# Altium PCB TYPEC_4KTransmitter-v1.0.PcbDoc (part 12 of 12)
Units mil, origin at the board's own origin, x right, y up, seen from the top; angles counter-clockwise.
Board outline 2834.7 x 1259.84 mil, 10 copper layers (Top Layer, GND-1, Signal L1, GND-2, PWR-1, PWR-2, GND-3, Signal L2, GND-4, Bottom Layer), stack 61.686 mil thick; 475 components, 338 nets, 2161 pads, 1240 vias.
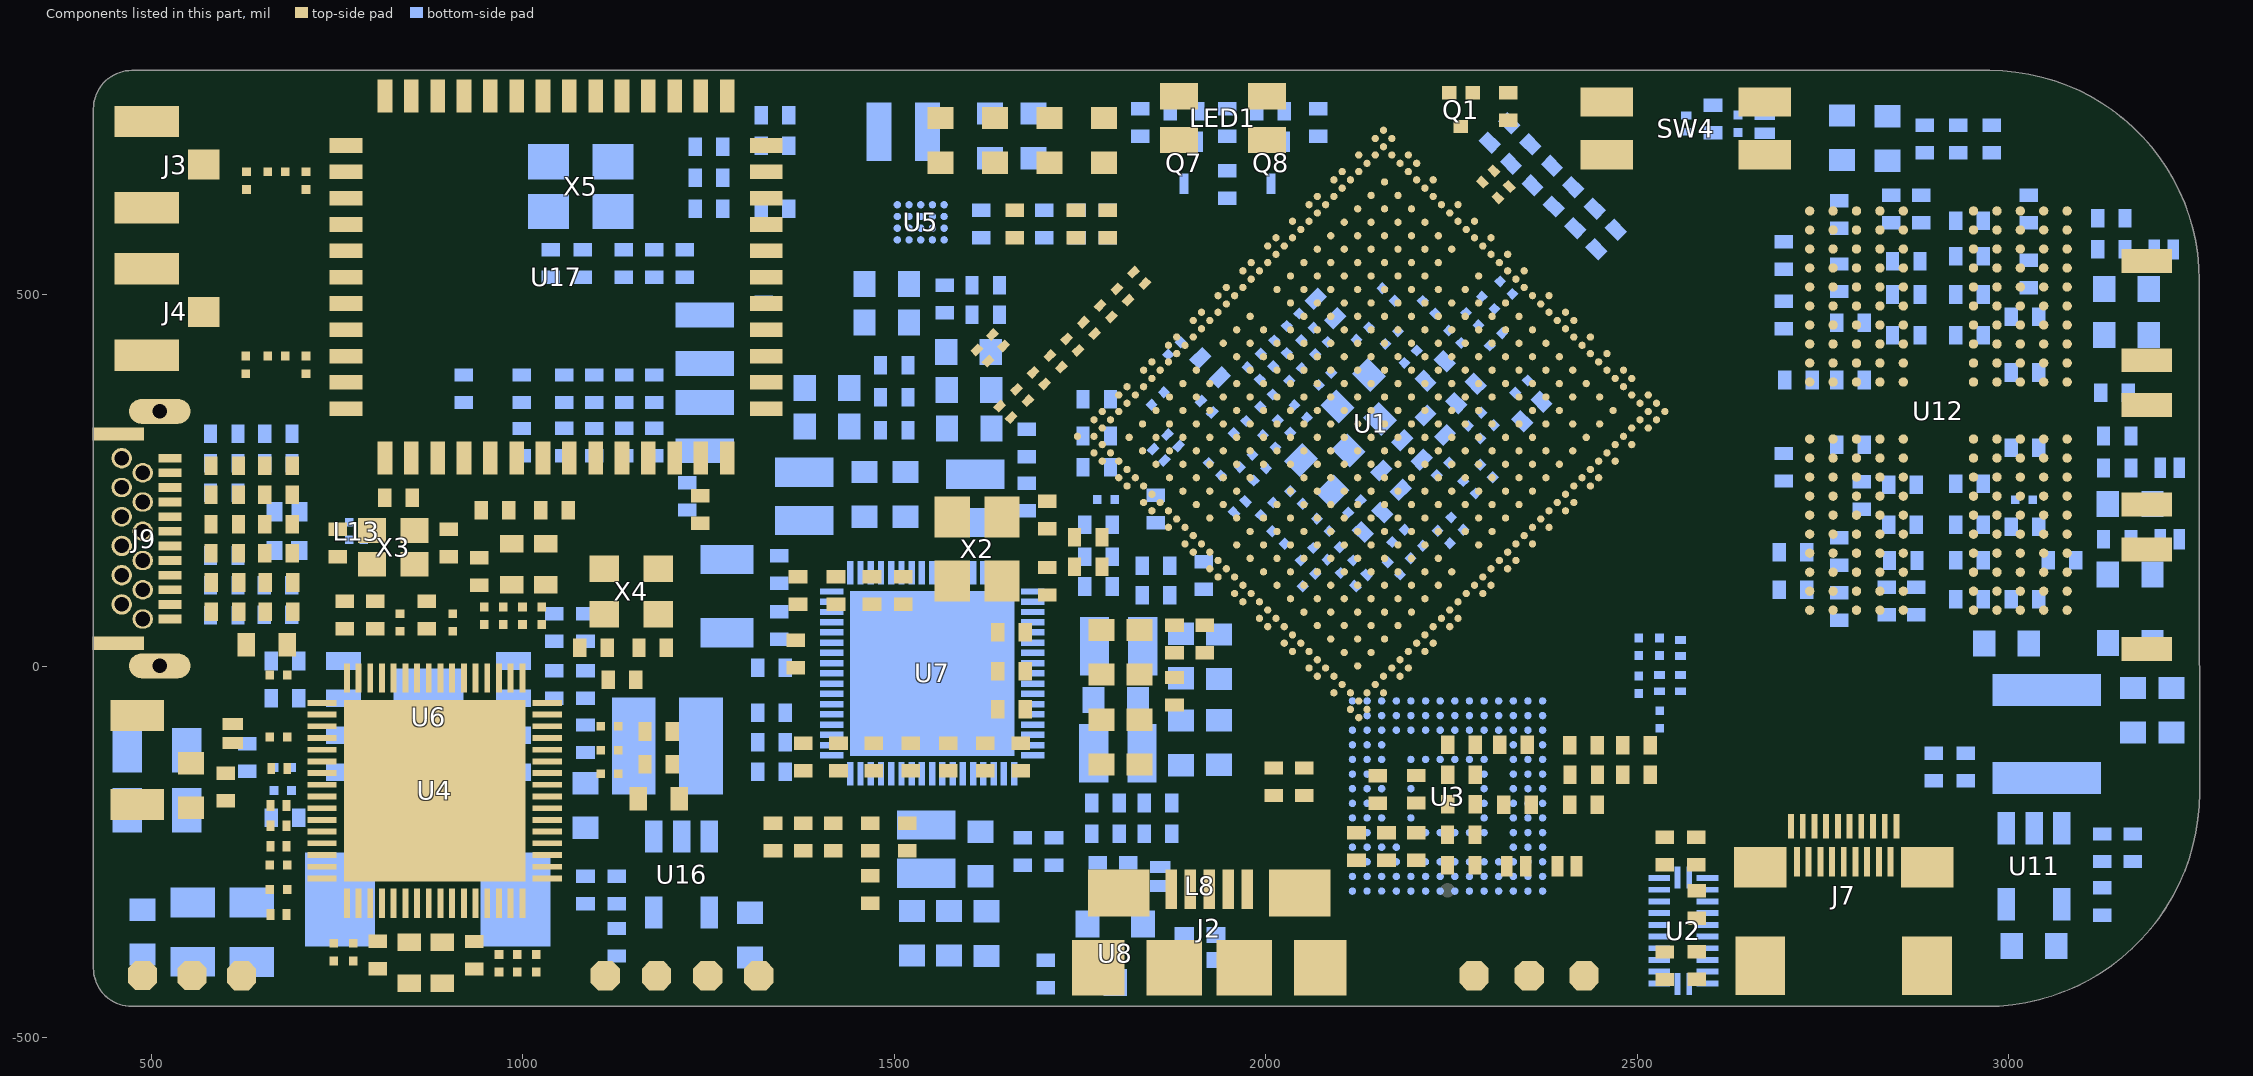
[diagram p18: the components of this part, seen from the top]

## Other copper (continued)
Bottom Layer:
  rectangle net VCC3V3_SYS: 1595.18,-247.78 1606.39,-187.05
  rectangle net VCC5V0_SYS: 2515.11,-289.34 2544.64,-256.98
  rectangle net VCC3V3_SYS: 1598.68,-247.78 1633.68,-208.17
  rectangle net VCC3V3_SYS: 1721.13,53.48 1725.06,68.58
  rectangle net NetC5_2: 1205.99,237.9 1316.22,306.49
  rectangle net VCCA1V8_IMAGE: 1742.65,90.73 1777.78,119.53
  rectangle net NetC10_2: 919.64,-377.27 1037.66,-251.28
  rectangle net VCC_1V2: 836.09,-440.56 856.21,-403.86
  rectangle net VCC3V3_SYS: 1340.01,-75.27 1367.49,-22.94
  rectangle net VCC3V3_SYS: 1491.82,-164.75 1500.48,-145.21
  rectangle net VCC3V3_SYS: 1277.47,-363.29 1374.87,-285.65
  rectangle net VCC_1V8: 1346.89,594.19 1397.36,651.51
  rectangle net VCC_3V3: 2566.29,-447.85 2580.07,-436.02
  rectangle net GND: 1031.94,77.44 1052.79,84.53
  region net GND: 626.13,-4.76 626.13,16.08 619.04,16.08 619.04,-4.76
  rectangle net GND: 448.03,-238.82 508.17,-81.46
  region net GND: 1062.89,-89.88 1062.89,-69.03 1055.8,-69.03 1055.8,-89.88
  rectangle net GND: 1038.79,-72.29 1059.63,-65.2
  rectangle net GND: 1202.08,-280.59 1225.7,-207.76
  rectangle net GND: 1181.38,-298.94 1259.01,-257.77
  rectangle net USB_D_N: 655.12,139.44 676.77,168.52
  rectangle net GND: 688.58,139.44 710.24,168.52
  rectangle net VCCIO_WL: 1260.37,594.19 1330.12,669.73
  rectangle net VCC0V6_DDR: 2874.86,709.36 2944.86,736.86
  rectangle net VCC5V_USB: 1818.91,-343.44 1885.98,-287.21
  rectangle net GND: 1877.54,-406.45 1905.44,-384.8
  rectangle net GND: 1917.25,-406.45 1946.14,-384.8
  rectangle net USB2.0_D_P: 1917.25,-372.99 1946.14,-351.34
  rectangle net USB2.0_D_N: 1877.54,-372.99 1905.44,-351.34
  rectangle net HDMITX_CEC: 2550.54,-447.85 2558.42,-413.36
  rectangle net VCC5V_USB: 1761.68,-310.92 1885.98,-287.21
  rectangle net VCC5V_USB: 1818.91,-365.34 1872.28,-288.17
  rectangle net SDMMC1_D3: 1027.62,340.11 1068.31,363.73
  rectangle net NetC5_2: 1209.22,237.9 1234.22,292.56
  rectangle net GND: 448.03,-418.27 669.31,-358.23
  rectangle net GND: 3124.22,-104.53 3247.36,-74.53
  rectangle net GND: 2965.52,-394.08 3019.35,-359.08
  rectangle net GND: 1311.89,478.15 1356.27,498.56
  region net GND: 1574.58,125.27 1574.58,72.71 1583.16,72.71 1583.16,125.27
  region net GND: 1588.36,125.27 1588.36,72.71 1596.94,72.71 1596.94,125.27
  region net GND: 1491.9,125.27 1491.9,72.71 1500.48,72.71 1500.48,125.27
  rectangle net GND: 1416.03,40.9 1468.59,49.48
  rectangle net GND: 868.22,-105.09 1037.66,-81.46
  rectangle net NetC5_2: 1205.99,273.03 1291.03,306.49
  rectangle net NetL10_1: 3059.94,-240.04 3101.75,-152.53
  rectangle net VCC3V3_SYS: 3037.22,-405.82 3107.71,-348.82
  rectangle net VCC3V3_SYS: 3037.22,-401.41 3083.57,-299.1
  rectangle net VCC3V3_SYS: 1442.68,186.07 1477.68,216.07
  rectangle net VCC3V3_SYS: 1425.67,186.07 1477.68,226.42
  rectangle net VCC3V3_SYS: 1228.89,-363.29 1374.87,-310.12
  rectangle net VCC_DDR: 3118.82,12.53 3171.41,98.85
  rectangle net VCC_DDR: 3071.77,12.53 3171.41,47.53
  rectangle net VCC_DDR: 2952.36,12.53 2992.36,47.53
  rectangle net VCC_DDR: 1501.68,-345.27 1586.45,-259.27
  rectangle net VCC_DDR: 1501.68,-350.91 1641.86,-309.97
  rectangle net VCCA1V8_IMAGE: 1742.65,94.53 1777.78,119.53
  rectangle net VCCA1V8_IMAGE: 1767.46,82.91 1777.78,99.18
  rectangle net VDD_GPU: 1825.18,78.88 1843.18,107.53
  rectangle net VDD_GPU: 1827.36,95.03 1841.01,135.03
  rectangle net NetC10_2: 943.17,-377.27 1037.66,-121.57
  rectangle net NetC11_1: 1030.1,-15.25 1097.1,2.74
  rectangle net NetC36_2: 1509.68,304.71 1527.68,417.53
  rectangle net NetC167_2: 1205.99,440.82 1336.89,464.44
  rectangle net NetC167_2: 1299.67,443.56 1324.39,461.56
  rectangle net NetC254_1: 3113.69,-307.25 3179.85,-254.07
  rectangle net NetC292_1: 1072.1,-363.29 1188.3,-310.12
  rectangle net NetL9_2: 1205.99,405.32 1313.82,428.94
  rectangle net NetL11_1: 1235.48,-251.06 1277.47,-42.44
  rectangle net NetR4_1: 987.86,-52.25 1055.1,-34.25
  rectangle net NetR11_2: 691.74,-5.09 777.47,18.54
  rectangle net NetR38_1: 692.29,-55.09 777.47,-31.46
  region net VCC5V_USB: 1761.68,-292.92 1761.68,-310.92 1872.28,-310.92 1872.28,-292.92
  rectangle net VCC_1V2: 1117.55,-291.77 1147.6,-168.94
  rectangle net VCC_1V2: 1048.85,-291.77 1139.39,-273.77
  rectangle net VCC_1V2: 1067.1,-176.6 1179.14,-105.09
  rectangle net VCC_WL: 1260.37,686.31 1341.51,779.61
  region net VCC3V3_SYS: 1497.8,151.98 1505.6,144.17 1505.6,109.52 1514.26,109.52 1514.26,153.89 1506.98,161.17
  region net VCC3V3_SYS: 1657.58,221.46 1657.58,171.83 1668.52,179.34 1679.86,190.68 1683.83,190.68 1694.55,201.4 1694.55,221.46
  region net NetR10_1: 1657.18,125.27 1657.18,141.03 1664.96,148.81 1668.03,145.74 1668.03,144.83 1665.44,142.24 1665.84,141.85 1665.84,125.27
  region net NetC33_2: 1643.4,125.27 1643.4,141.03 1651.18,148.81 1654.25,145.74 1654.25,144.83 1651.67,142.24 1652.06,141.85 1652.06,125.27
  pour cut-out: 934.03,-229.95 906.39,-229.95 906.39,-238.62 1037.66,-238.62 1037.66,-115.52 934.03,-115.52
  pour cut-out: 786.56,25.52 675.82,25.52 675.82,-31.46 782.47,-31.46 782.47,-229.95 792.55,-229.95 792.55,25.52
  pour cut-out: 1496.19,-356.32 1598.68,-356.32 1598.68,-233.68 1496.19,-233.68
  pour cut-out: 2465.41,-218.14 2632.14,-218.14 2632.14,-19.46 2465.41,-19.46
  pour cut-out: 1684.31,534.77 1804.51,534.77 1804.51,590.55 1684.31,590.55
  pour cut-out: 982.46,243.2 1289.73,243.2 1289.73,421.49 982.46,421.49
  pour cut-out: 565.94,51.9 688.58,51.9 688.58,232.03 565.94,232.03
  pour cut-out: 567.33,230.61 702.18,230.61 702.18,328.79 567.33,328.79
  pour cut-out: 819.36,-458.69 919.64,-458.69 919.64,-360.52 819.36,-360.52
  pour cut-out: 2313.83,142.9 2314.64,142.09 2314.64,135.13 2469.74,-19.97 3142.35,-19.97 3142.35,633.66 3073.08,702.94 2452.65,702.94 2313.83,564.12
  pour cut-out: 2162.35,-282.47 2421.92,-282.47 2421.92,-50.73 2162.98,-50.73 2162.35,-51.36

## Silkscreen, mask and mechanical layers (free items; w line width, h text height)
Top Overlay:
  drawing of 53 lines, arcs and shapes, not listed
  text "RCY" at 3138.39,551.55 h30 r90
  text "PWR" at 3138.39,355.8 h30 r90
  text "S" at 560.29,308.65 h50
  text "S" at 586.9,308.47 h50
  text "RST" at 3143.37,159.82 h30 r90
  text "4K" at 2672.67,-143.72 h50
  text "2.0" at 1964.17,-253.64 h50
  text "D0" at 2169.78,-361.94 h40
  text "GND" at 2290.66,-377.7 h40 r90
  text "RX" at 2365.59,-377.7 h40 r90
  text "5V0" at 498.53,-378.79 h40 r90
  text "3V3" at 565.18,-378.79 h40 r90
  text "GND" at 631.84,-378.79 h40 r90
  text "TX" at 2447.5,-382.7 h40 r90
  text "GPIO" at 1129.57,-383.79 h40 r90
  text "HPD" at 1196.73,-383.79 h40 r90
  text "SDA" at 1266.92,-383.79 h40 r90
  text "SCL" at 1335.8,-383.79 h40 r90
Bottom Overlay:
  lines w10: 682.78,547.75 686.16,551.14
  lines w12: 659.82,559.56 659.82,550.49 663.21,547.1 ; 664.66,545.76 680.78,545.76 686.16,551.14 686.16,560.21
  text "RE  EIVER" at 655.16,483.96 h60 r270
  text "4K" at 655.29,399.53 h60 r270
Dimensions:
  drawing of 659 lines, arcs and shapes, not listed
  text "Layer" at 567.85,5981.73 h60
  text "Name" at 977.76,5981.73 h60
  text "Material" at 1907.5,5981.73 h60
  text "Thickness" at 2507.36,5981.73 h60
  text "Constant" at 3157.19,5981.73 h60
  text "Board Layer Stack" at 3727.05,5981.73 h60
  text "Top Overlay" at 977.76,5861.73 h60
  text "Top Solder" at 977.76,5741.73 h60
  text "SM-001" at 1907.5,5741.73 h60
  text "0.025mm" at 2507.36,5741.73 h60
  text "4" at 3157.19,5741.73 h60
  text "1" at 567.85,5621.73 h60
  text "Top Layer" at 977.76,5621.73 h60
  text "0.035mm" at 2507.36,5621.73 h60
  text "Dielectric 1" at 977.76,5501.73 h60
  text "PP-007" at 1907.5,5501.73 h60
  text "0.076mm" at 2507.36,5501.73 h60
  text "4.2" at 3157.19,5501.73 h60
  text "2" at 567.85,5381.73 h60
  text "GND-1" at 977.76,5381.73 h60
  text "CF-004" at 1907.5,5381.73 h60
  text "0.035mm" at 2507.36,5381.73 h60
  text "Dielectric 2" at 977.76,5261.73 h60
  text "PP-007" at 1907.5,5261.73 h60
  text "0.076mm" at 2507.36,5261.73 h60
  text "4.2" at 3157.19,5261.73 h60
  text "Dielectric 3" at 977.76,5141.73 h60
  text "PP-007" at 1907.5,5141.73 h60
  text "0.076mm" at 2507.36,5141.73 h60
  text "4.2" at 3157.19,5141.73 h60
  text "3" at 567.85,5021.73 h60
  text "Signal L1" at 977.76,5021.73 h60
  text "CF-004" at 1907.5,5021.73 h60
  text "0.035mm" at 2507.36,5021.73 h60
  text "Core 1" at 977.76,4901.73 h60
  text "Core-024" at 1907.5,4901.73 h60
  text "0.203mm" at 2507.36,4901.73 h60
  text "4.6" at 3157.19,4901.73 h60
  text "4" at 567.85,4781.73 h60
  text "GND-2" at 977.76,4781.73 h60
  text "CF-004" at 1907.5,4781.73 h60
  text "0.035mm" at 2507.36,4781.73 h60
  text "Dielectric 4" at 977.76,4661.73 h60
  text "PP-1080" at 1907.5,4661.73 h60
  text "0.075mm" at 2507.36,4661.73 h60
  text "4" at 3157.19,4661.73 h60
  text "5" at 567.85,4541.73 h60
  text "PWR-1" at 977.76,4541.73 h60
  text "CF-004" at 1907.5,4541.73 h60
  text "0.035mm" at 2507.36,4541.73 h60
  text "Core 2" at 977.76,4421.73 h60
  text "Core-024" at 1907.5,4421.73 h60
  text "0.203mm" at 2507.36,4421.73 h60
  text "4.6" at 3157.19,4421.73 h60
  text "6" at 567.85,4301.73 h60
  text "PWR-2" at 977.76,4301.73 h60
  text "CF-004" at 1907.5,4301.73 h60
  text "0.035mm" at 2507.36,4301.73 h60
  text "Dielectric 5" at 977.76,4181.73 h60
  text "PP-1080" at 1907.5,4181.73 h60
  text "0.075mm" at 2507.36,4181.73 h60
  text "4" at 3157.19,4181.73 h60
  text "7" at 567.85,4061.73 h60
  text "GND-3" at 977.76,4061.73 h60
  text "CF-004" at 1907.5,4061.73 h60
  text "0.035mm" at 2507.36,4061.73 h60
  text "Core 3" at 977.76,3941.73 h60
  text "Core-024" at 1907.5,3941.73 h60
  text "0.203mm" at 2507.36,3941.73 h60
  text "4.6" at 3157.19,3941.73 h60
  text "8" at 567.85,3821.73 h60
  text "Signal L2" at 977.76,3821.73 h60
  text "CF-004" at 1907.5,3821.73 h60
  text "0.035mm" at 2507.36,3821.73 h60
  text "Dielectric 6" at 977.76,3701.73 h60
  text "PP-007" at 1907.5,3701.73 h60
  text "0.076mm" at 2507.36,3701.73 h60
  text "4.2" at 3157.19,3701.73 h60
  text "Dielectric 7" at 977.76,3581.73 h60
  text "PP-007" at 1907.5,3581.73 h60
  text "0.076mm" at 2507.36,3581.73 h60
  text "4.2" at 3157.19,3581.73 h60
  text "9" at 567.85,3461.73 h60
  text "GND-4" at 977.76,3461.73 h60
  text "CF-004" at 1907.5,3461.73 h60
  text "0.035mm" at 2507.36,3461.73 h60
  text "Dielectric 8" at 977.76,3341.73 h60
  text "PP-007" at 1907.5,3341.73 h60
  text "0.076mm" at 2507.36,3341.73 h60
  text "4.2" at 3157.19,3341.73 h60
  text "10" at 567.85,3221.73 h60
  text "Bottom Layer" at 977.76,3221.73 h60
  text "0.035mm" at 2507.36,3221.73 h60
  text "Bottom Solder" at 977.76,3101.73 h60
  text "SM-001" at 1907.5,3101.73 h60
  text "0.025mm" at 2507.36,3101.73 h60
  text "4" at 3157.19,3101.73 h60
  text "Bottom Overlay" at 977.76,2981.73 h60
  text "Total board thickness:" at 567.85,2861.73 h60
  text "1.618mm" at 2507.36,2861.73 h60
Board Outline:
  the board outline again, w7
Drill Drawing:
  circle w10: c597.98,2304 r33.33
  lines w10: 564.65,2037.34 631.31,2037.34 597.98,1970.67 564.65,2037.34 ; 564.65,2120.67 631.31,2120.67 631.31,2187.34 564.65,2187.34 564.65,2120.67 ; 564.65,2437.34 581.31,2437.34 597.98,2420.67 614.65,2437.34 631.31,2437.34 614.65,2454 631.31,2470.67 614.65,2470.67 597.98,2487.34 581.31,2470.67 564.65,2470.67 581.31,2454 564.65,2437.34
  lines w15: 504.86,1925.67 11135.9,1925.67 ; 504.86,2525.67 11135.9,2525.67 ; 1055.73,1775.67 1055.73,2675.67 ; 1655.57,1775.67 1655.57,2675.67 ; 2745.26,1775.67 2745.26,2675.67 ; 3251.13,1775.67 3251.13,2675.67 ; 3984.93,1775.67 3984.93,2675.67 ; 5484.48,1775.67 5484.48,2675.67 ; 6074.33,1775.67 6074.33,2675.67 ; 6820.13,1775.67 6820.13,2675.67 ; 7569.92,1775.67 7569.92,2675.67 ; 8423.69,1775.67 8423.69,2675.67 ; 9757.3,1775.67 9757.3,2675.67 ; 504.86,1775.67 11135.9,1775.67 11135.9,2675.67 504.86,2675.67 504.86,1775.67
  text "Symbol" at 594.86,2570.67 h72
  text "Count" at 1100.73,2570.67 h72
  text "Hole Size" at 1700.57,2570.67 h72
  text "Plated" at 2790.26,2570.67 h72
  text "Hole Type" at 3296.13,2570.67 h72
  text "Drill Layer Pair" at 4029.93,2570.67 h72
  text "Via/Pad" at 5529.48,2570.67 h72
  text "Pad Shape" at 6119.33,2570.67 h72
  text "Template" at 6865.13,2570.67 h72
  text "Description" at 7614.92,2570.67 h72
  text "Hole Tolerance (+)" at 8468.69,2570.67 h72
  text "Hole Tolerance (-)" at 9802.3,2570.67 h72
  text "2" at 1100.73,2420.67 h60
  text "19.69mil (0.500mm)" at 1700.57,2420.67 h60
  text "PTH" at 2790.26,2420.67 h60
  text "Slot" at 3296.13,2420.67 h60
  text "Top Layer - Bottom Layer" at 4029.93,2420.67 h60
  text "Pad" at 5529.48,2420.67 h60
  text "Rounded" at 6119.33,2420.67 h60
  text "(Mixed)" at 6865.13,2420.67 h60
  text "12" at 1100.73,2270.67 h60
  text "19.69mil (0.500mm)" at 1700.57,2270.67 h60
  text "PTH" at 2790.26,2270.67 h60
  text "Round" at 3296.13,2270.67 h60
  text "Top Layer - Bottom Layer" at 4029.93,2270.67 h60
  text "Pad" at 5529.48,2270.67 h60
  text "Rounded" at 6119.33,2270.67 h60
  text "(Mixed)" at 6865.13,2270.67 h60
  text "265" at 1100.73,2120.67 h60
  text "7.87mil (0.200mm)" at 1700.57,2120.67 h60
  text "PTH" at 2790.26,2120.67 h60
  text "Round" at 3296.13,2120.67 h60
  text "Top Layer - Bottom Layer" at 4029.93,2120.67 h60
  text "Via" at 5529.48,2120.67 h60
  text "Rounded" at 6119.33,2120.67 h60
  text "v40h20m0mx0" at 6865.13,2120.67 h60
  text "714" at 1100.73,1970.67 h60
  text "5.91mil (0.150mm)" at 1700.57,1970.67 h60
  text "PTH" at 2790.26,1970.67 h60
  text "Round" at 3296.13,1970.67 h60
  text "Top Layer - Bottom Layer" at 4029.93,1970.67 h60
  text "Via" at 5529.48,1970.67 h60
  text "Rounded" at 6119.33,1970.67 h60
  text "(Mixed)" at 6865.13,1970.67 h60
  text "993 Total" at 1100.73,1820.67 h60
  text "Slot definitions :" at 594.86,1675.69 h60
  text "Routed Path Length" at 1627.55,1675.69 h60
  text "= Calculated from tool start centre position to tool end centre position." at 2730.21,1675.69 h60
  text "Hole Length" at 1627.55,1575.72 h60
  text "= Routed Path Length + Tool Size = Slot length as defined in the PCB layout" at 2320.34,1575.72 h60

## Dimensions
473.88,801.57 to 473.88,-458.27 on Dimensions
3257,171.83 to 422.36,750.05 on Dimensions